# Altium PCB STEP_DRIVER_V3.0.PcbDoc (part 1 of 5)
Units mm, origin at the board's own origin, x right, y up, seen from the top; angles counter-clockwise.
Board outline 245.25 x 200.25 mm, 2 copper layers (Top Layer, Bottom Layer), stack 1.371 mm thick; 477 components, 170 nets, 1104 pads, 876 vias.
Unrouted connection lines stored in the file: 4.
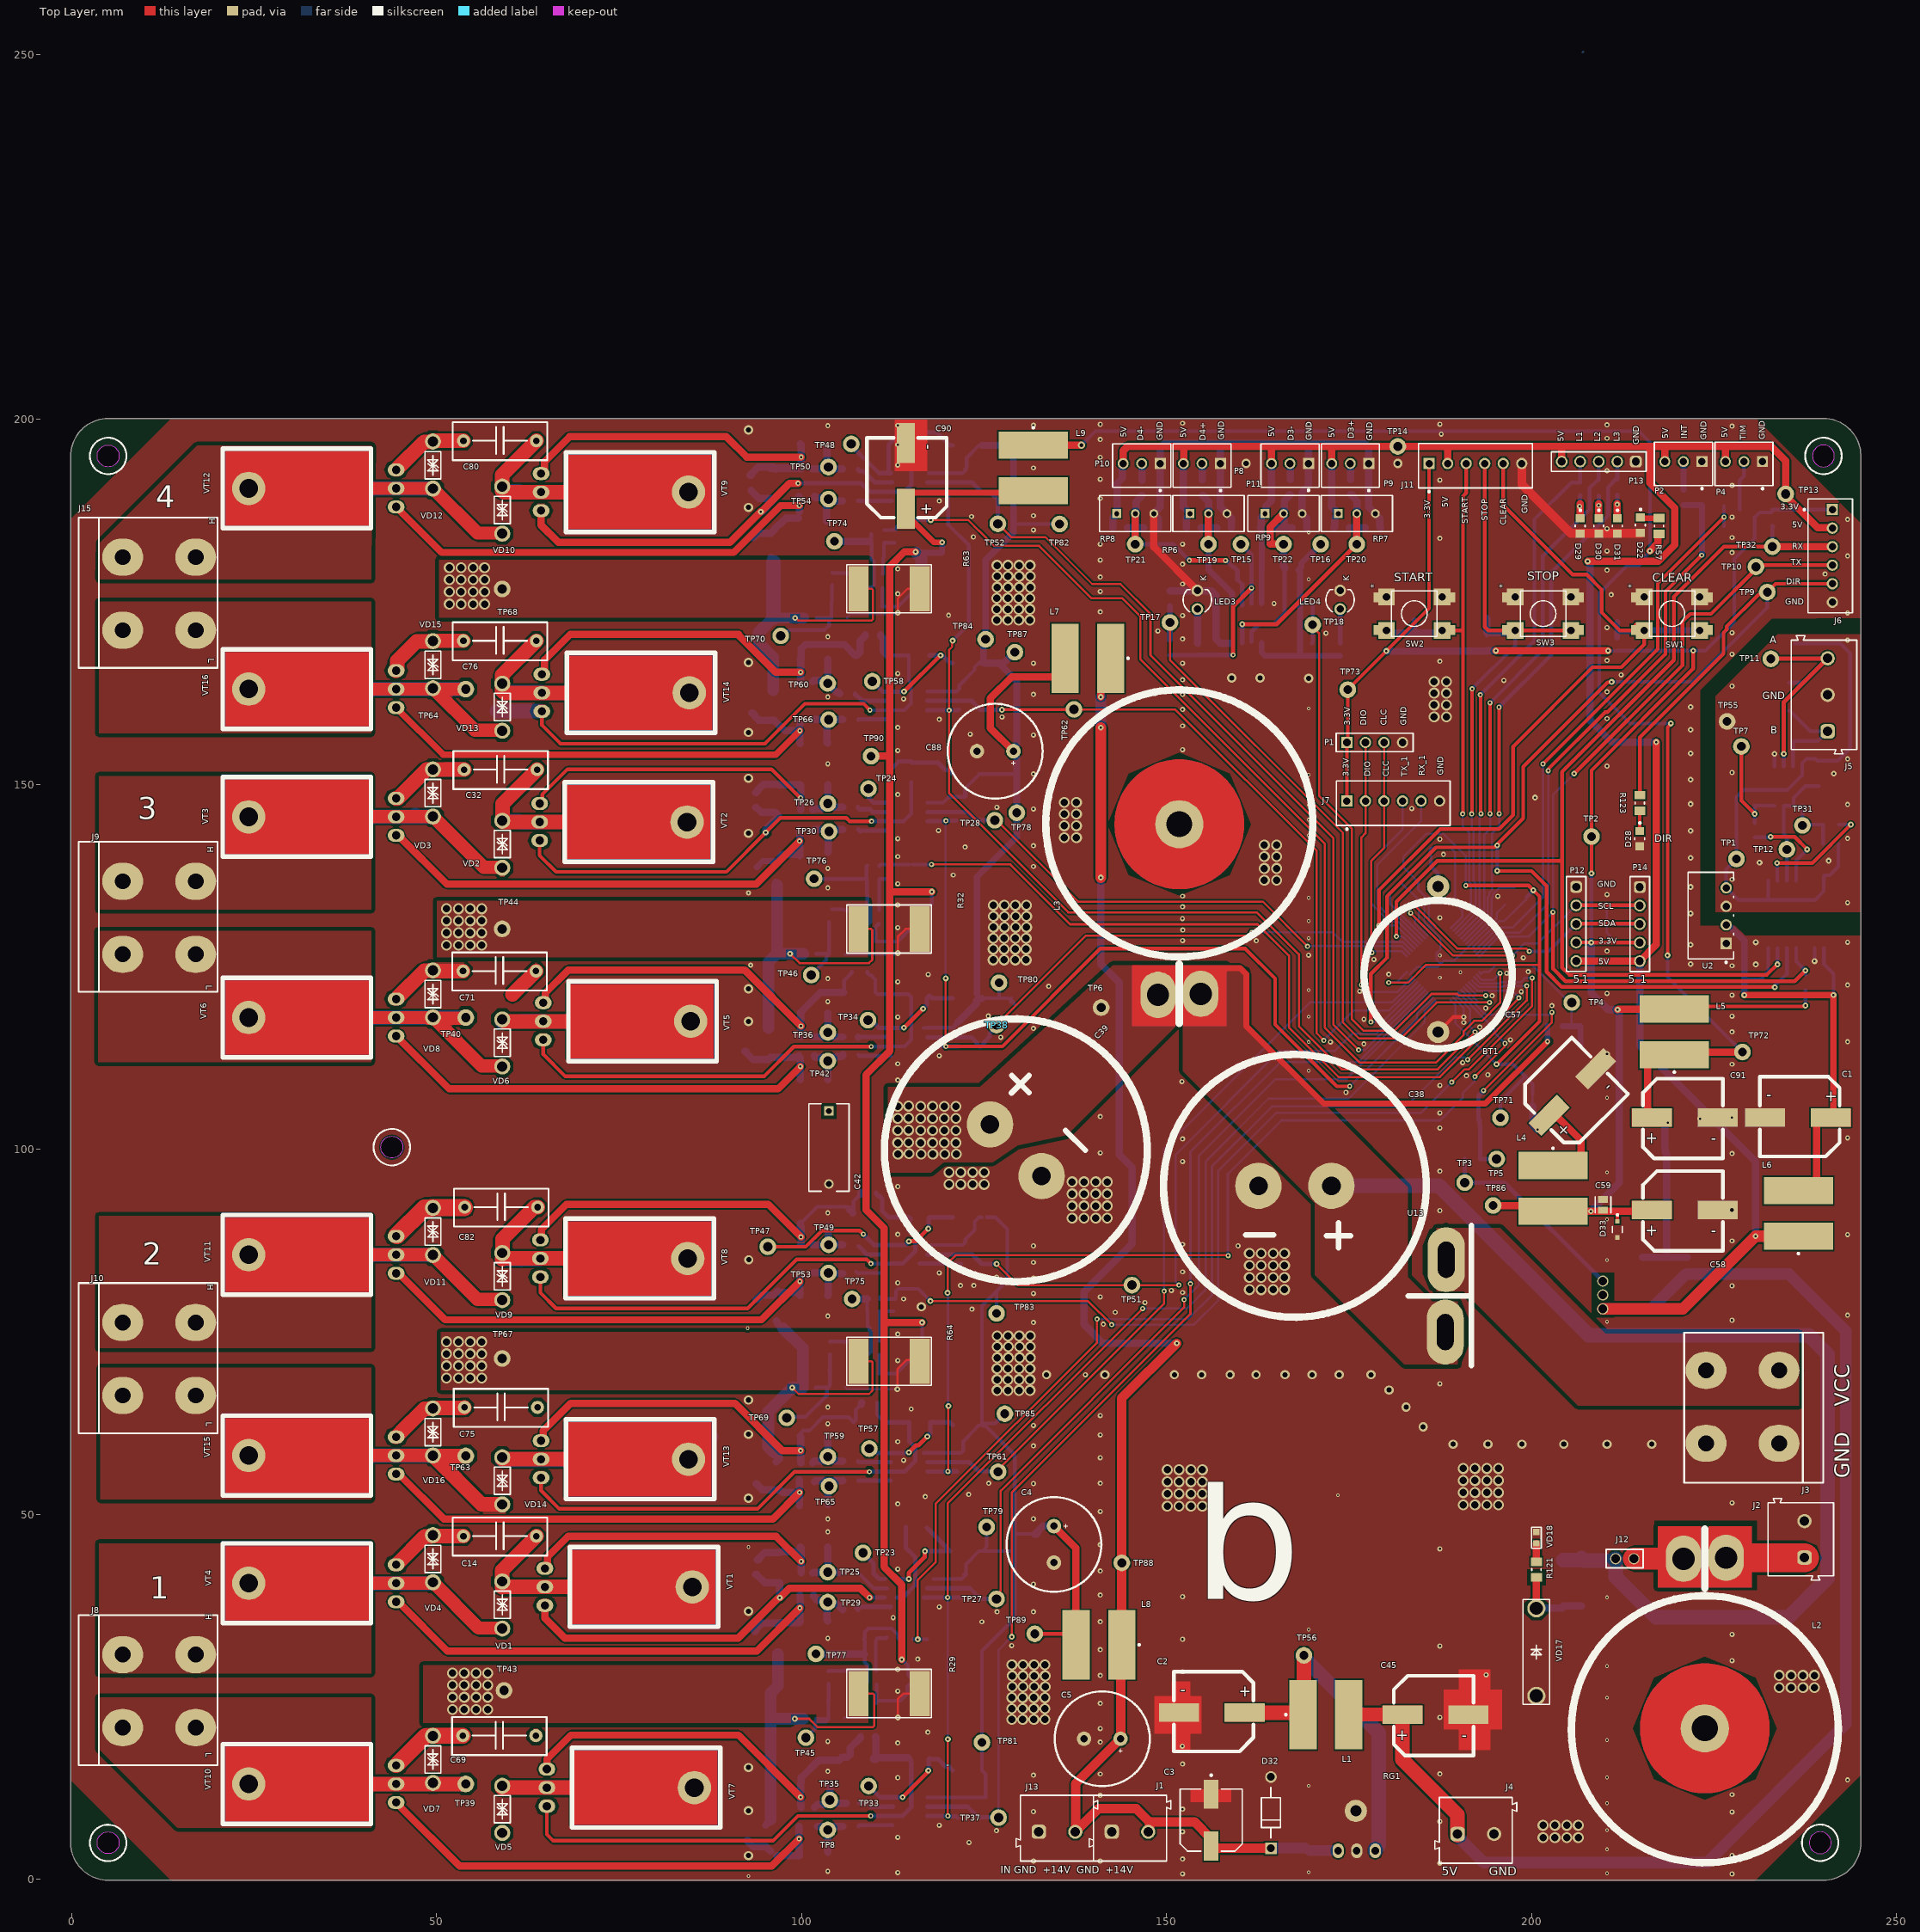
[diagram p0: Top Layer view]
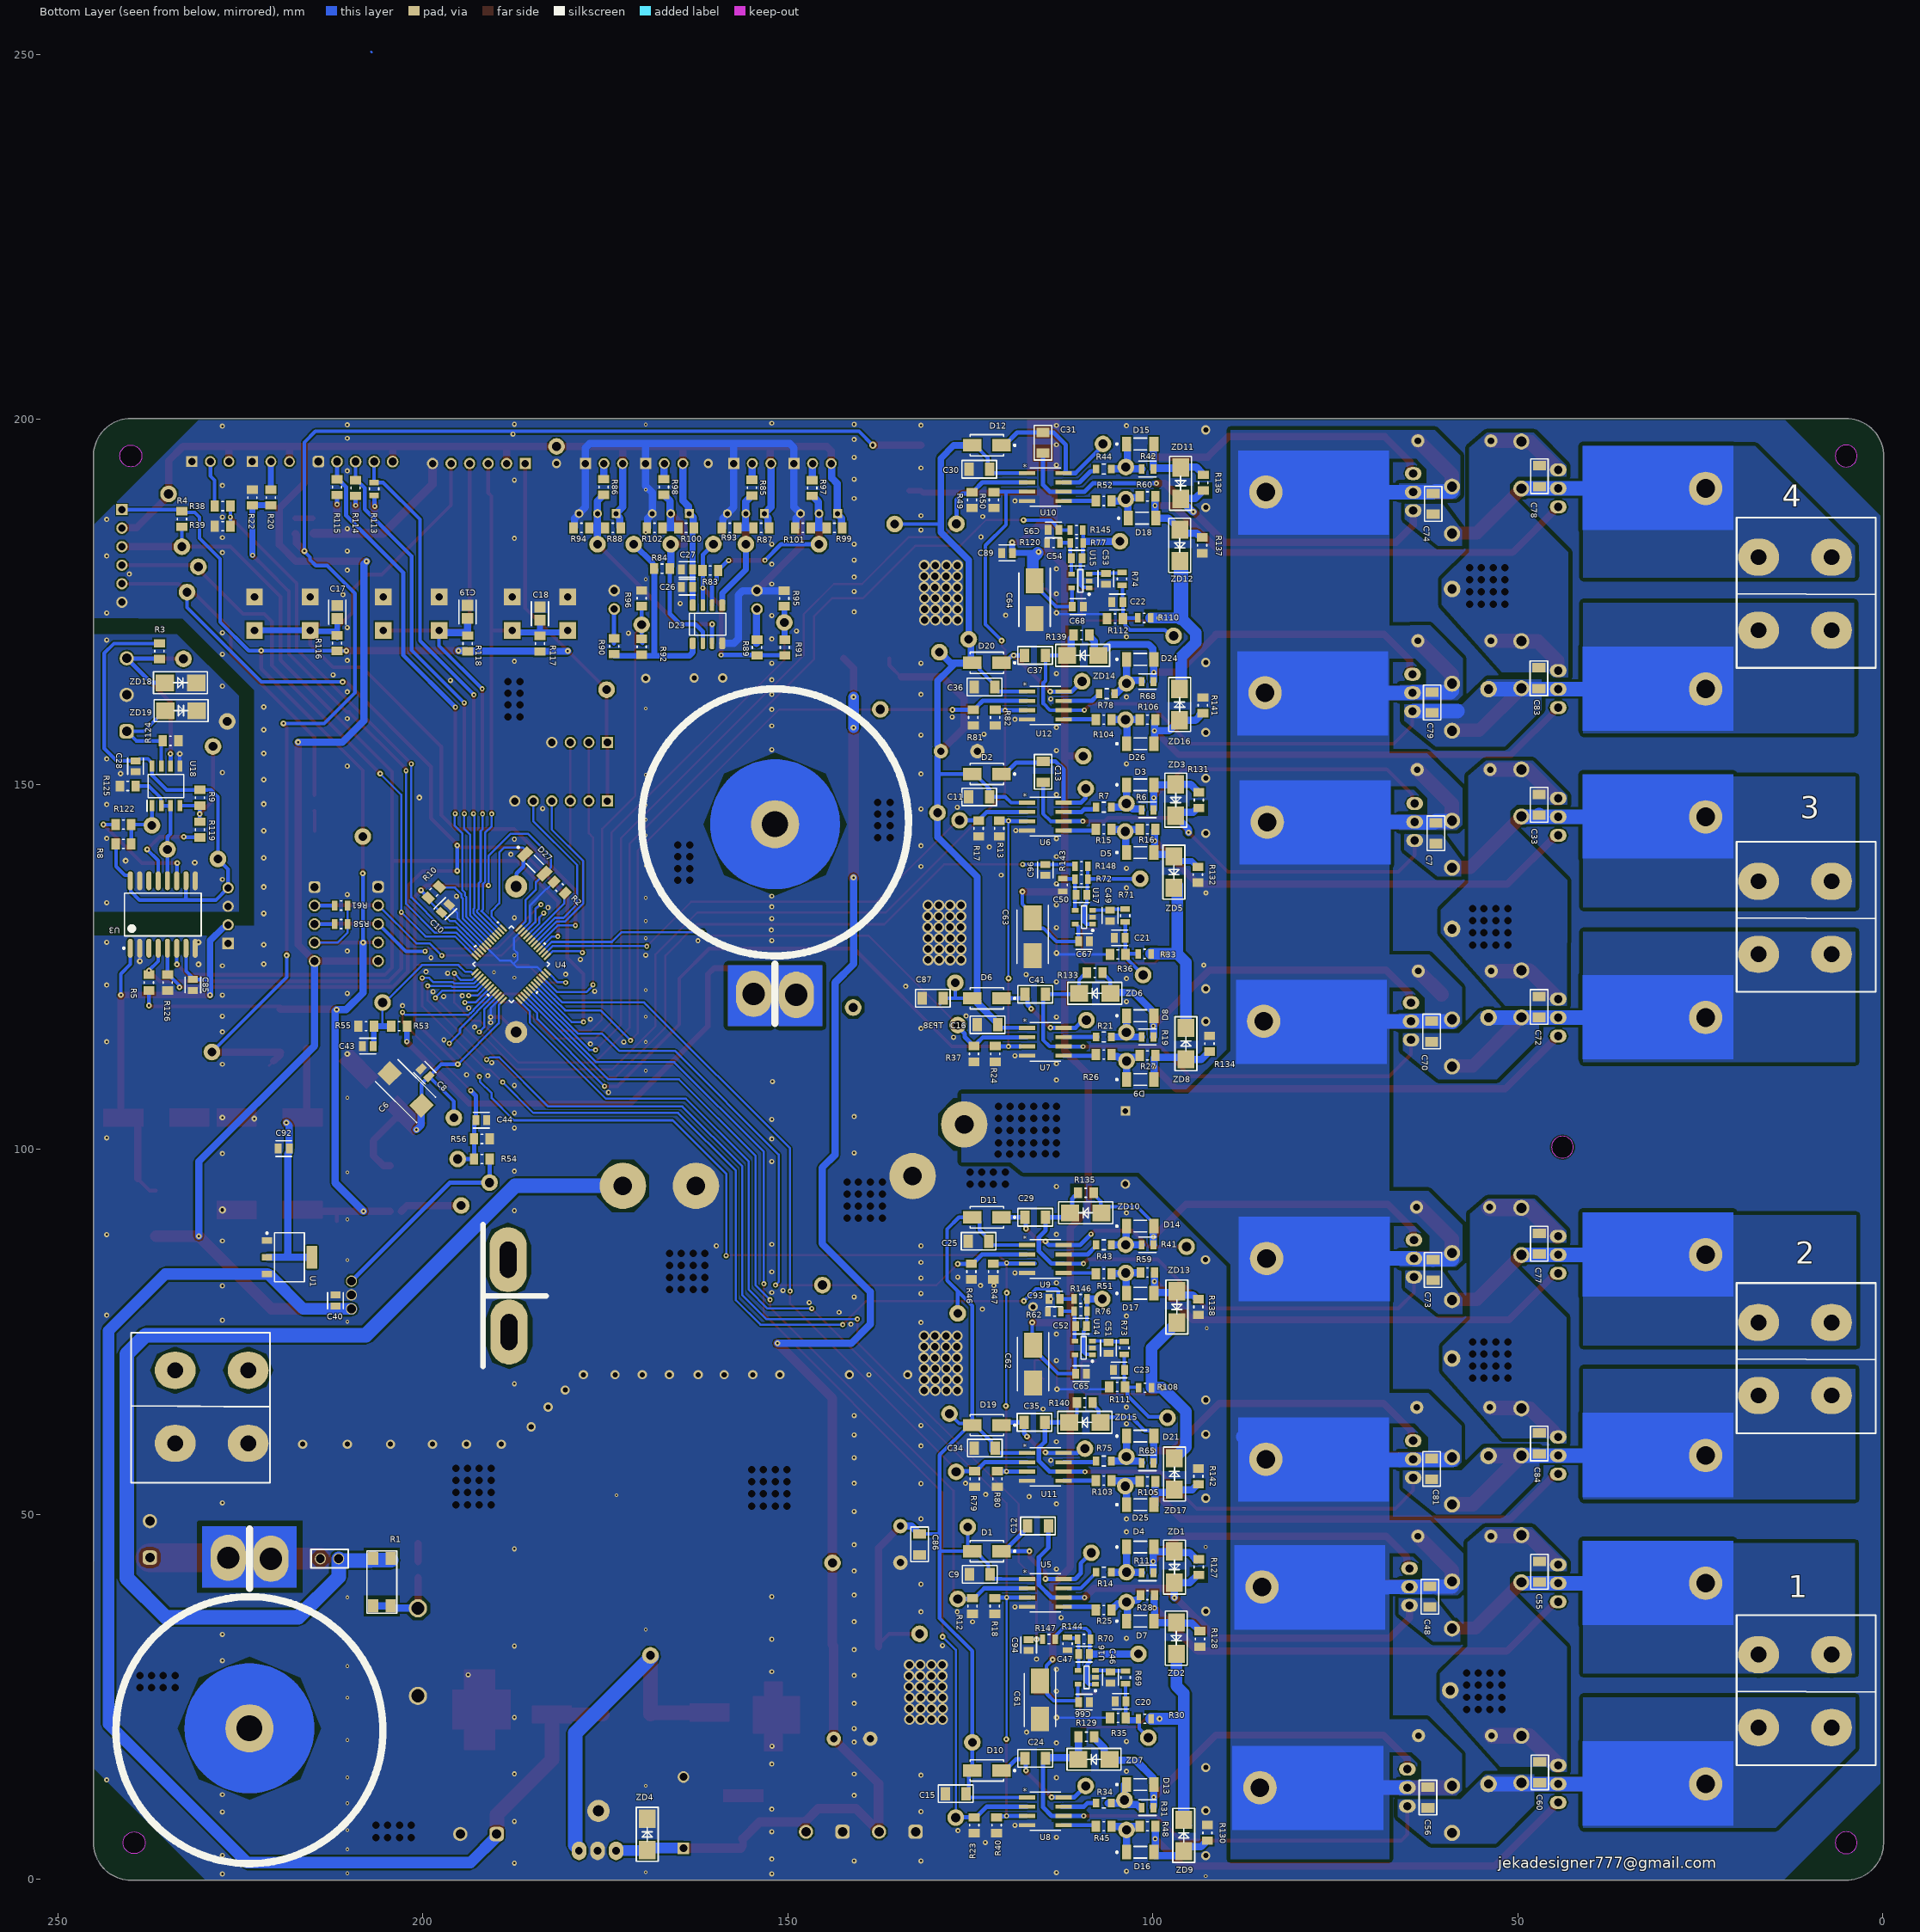
[diagram p1: Bottom Layer view, seen from below]
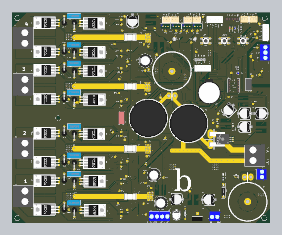
[diagram p5: 3D render of the assembled board from above, using the file's embedded part models]
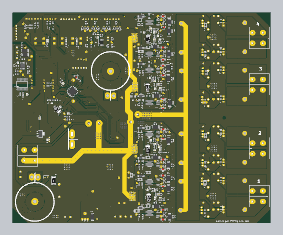
[diagram p6: 3D render of the assembled board from below, using the file's embedded part models]

## Layer stack, top to bottom
Top Solder: solder mask 0.0102, Solder Resist, Dk 3.5
Top Layer: signal copper 0.0356
Dielectric 1: dielectric 1.3, FR-4, Dk 4.8
Bottom Layer: signal copper 0.0356
Bottom Solder: solder mask 0.0102, Solder Resist, Dk 3.5

## Board outline
-0.127,4.914 -0.127,4.968 cw(c5.003,5) -0.127,5 cw(c0,5) -0.127,5.005 -0.127,194.914 cw(c0,194.914) -0.12,194.957 cw(c0,195) -0.127,195 cw(c5,195) 5,200.127 cw(c5,200) 5.003,200.127 240.026,200.127 cw(c240.027,200) 240.027,200.127 cw(c240,195) 245.126,195.136 cw(c245,195.115) 245.127,195.115 245.127,5.115 cw(c245,5.115) 245.114,5.057 cw(c245,5) 245.127,5 cw(c240,5) 240,-0.127 cw(c240,0) 239.998,-0.127 5,-0.127 cw(c5,5) -0.126,4.899 cw(c0,4.914)
cut-out: 238.5,195 ccw(c240,195) 240,193.5 ccw(c240,195) 241.5,195 ccw(c240,195) 240,196.5 ccw(c240,195)
cut-out: 43.868,98.8 cw(c43.868,100.3) 42.368,100.3 cw(c43.868,100.3) 43.868,101.8 cw(c43.868,100.3) 45.368,100.3 cw(c43.868,100.3)
cut-out: 5,193.5 cw(c5,195) 3.5,195 cw(c5,195) 5,196.5 cw(c5,195) 6.5,195 cw(c5,195)
cut-out: 5,3.5 cw(c5,5) 3.5,5 cw(c5,5) 5,6.5 cw(c5,5) 6.5,5 cw(c5,5)
cut-out: 238.05,5 ccw(c239.55,5) 239.55,3.5 ccw(c239.55,5) 241.05,5 ccw(c239.55,5) 239.55,6.5 ccw(c239.55,5)

## Design rules (kind name [scope] priority, off if disabled: settings)
Clearance HV [InNetClass('All Nets') vs InNetClass('HV')] p1: gap=0.2 ignorepadtopadclearanceinfootprint=TRUE except(0: Text-Text Text-Hole; 0.4: THPad-THPad THPad-Via THPad-Fill THPad-Poly THPad-Region THPad-Text THPad-Hole Via-Via Via-Fill Via-Poly Via-Region Via-Text Via-Hole; 0.5: SMDPad-SMDPad SMDPad-THPad SMDPad-Via SMDPad-Fill SMDPad-Poly SMDPad-Region SMDPad-Text SMDPad-Hole Fill-Fill Fill-Poly Fill-Region Fill-Text Fill-Hole Poly-Poly Poly-Region Poly-Text Poly-Hole Region-Region Region-Text Region-Hole)
Clearance Clearance_1 [All] p2: gap=0.18 ignorepadtopadclearanceinfootprint=TRUE
Clearance GND [InNet('GND')] p3: gap=0.4 ignorepadtopadclearanceinfootprint=TRUE except(0.3: Text-Text Text-Hole)
ComponentClearance [All] p1: gap=-2.254 collisioncheckmode=3 verticalgap=0.254 showdistances=FALSE
DiffPairsRouting [All] p1: maxlimit=0.254 minlimit=0.1 mostfreqgap=0.254 toplayer_minwidth=0.3 toplayer_maxwidth=2 toplayer_prefwidth=0.3 bottomlayer_minwidth=0.3 bottomlayer_maxwidth=2 bottomlayer_prefwidth=0.3 maxuncoupledlength=12.7
Height [All] p1: minheight=0 maxheight=55.4 prefheight=12.7
HoleSize [All] p1: absolutevalues=TRUE maxlimit=5 minlimit=0.025 maxpercent=80.000 minpercent=20.000
HoleToHoleClearance [All] p1: gap=0 allowstackedmicrovias=TRUE
LayerPairs [All] p1 off: enforce=TRUE
MinimumSolderMaskSliver [All] p1: minsoldermaskwidth=0.01
PlaneClearance [All] p1: clearance=0.4
PlaneConnect [All] p1: planeconnectstyle=Direct reliefexpansion=0.508 reliefentries=4 reliefconductorwidth=0.254 reliefairgap=0.254
PolygonConnect [All] p1: connectstyle=Direct reliefconductorwidth=0.254 reliefentries=4 polygonreliefangle="90 Angle" airgapwidth=0.254
RoutingCorners [All] p1: cornerstyle=45-Degree minsetback=0.2 maxsetback=0.2
RoutingVias [All] p1: holewidth=0.4 width=0.8 viastyle="Through Hole" minholewidth=0.254 minwidth=0.5 maxholewidth=0.75 maxwidth=1.5
ShortCircuit [All] p1: allowed=TRUE
SilkToSilkClearance [All] p1 off: silktosilkclearance=0.01
SilkToSolderMaskClearance [All] p1: minsilkscreentomaskgap=0 clearancetoexposedcopper=FALSE
SolderMaskExpansion [All] p1: expansion=0 istentingtop=FALSE
UnRoutedNet [All] p1: checkbadconnections=TRUE
Width [All] p1: maxlimit=10 minlimit=0.254 preferedwidth=2
16 further rules are at their usual default settings.

## Classes and differential pairs
net class HV: NetC7_1 NetC12_1 NetC14_2 NetC24_1 NetC29_1 NetC31_1 NetC32_2 NetC35_1 NetC37_1 NetC41_1 NetC75_2 NetC76_2 NetJ2_1 NetJ3_2 NetJ12_1 NetR1_1 V_BAT V_PS

## Components (designator, comment, footprint, x,y, rotation, side; value= is the part's Value field where it differs from the comment)
BT1 "CR2032_BAT" CR2032_BAT 187.218,123.95 r90 top locked
C1 "1000uF_10V" 1000uF_10V_Size_F 236.5,104.35 r0 top
C2 "1000uF_10V" 1000uF_10V_Size_F 156.2,22.85 r0 top
C3 "EEE-1HA101UP" FP-SF-MFG 156.125,8.1 r270 top value=100uF
C4 "25V 2200uF" CAPPOL-12x25 134.575,45.875 r270 top
C5 "25V 2200uF" CAPPOL-12x25 141.2,19.25 r180 top
C6 "293D106X9050E2TE3" CAPPM7343X430N#1 202.366,108.214 r45 bottom locked
C7 "1000pF" CAP-1206 61.213,143.3 r90 bottom
C8 "C0805C224K5RACTU" FP-C0805C-DN-MFG 199.699,110.5 r45 bottom locked value="0.22 μF"
C9 "CAP-NON-POLAR" CAP-1206 123.693,41.779 r180 bottom
C10 "C0805C224K5RACTU" FP-C0805C-DN-MFG 196.905,132.979 r135 bottom locked value="0.22 μF"
C11 "CAP-NON-POLAR" CAP-1206 123.784,148.285 r180 bottom
C12 "CAP-NON-POLAR" CAP-1206 115.725,48.4 r0 bottom
C13 "CAP-NON-POLAR" CAP-1206 115.023,151.714 r90 bottom
C14 "CAP-NON-POLAR" "MKP 100nF 275VAC" 58.675,47 r180 top locked
C15 "CAP-NON-POLAR" CAP-1206 126.993,11.723 r180 bottom
C16 "CAP-NON-POLAR" CAP-1206 122.636,117.065 r180 bottom
C17 "C0805C224K5RACTU" FP-C0805C-DN-IPC_A 211.712,173.6 r270 bottom value="0.22 μF"
C18 "C0805C224K5RACTU" FP-C0805C-DN-IPC_A 183.945,173.397 r270 bottom value="0.22 μF"
C19 "C0805C224K5RACTU" FP-C0805C-DN-IPC_A 193.873,173.631 r270 bottom value="0.22 μF"
C20 "C0805C224K5RACTU" FP-C0805C-DN-MFG 104.41,24.375 r0 bottom value="0.22 μF"
C21 "C0805C224K5RACTU" FP-C0805C-DN-MFG 104.521,128.979 r0 bottom value="0.22 μF"
C22 "C0805C224K5RACTU" FP-C0805C-DN-MFG 104.85,174.985 r0 bottom value="0.22 μF"
C23 "C0805C224K5RACTU" FP-C0805C-DN-MFG 104.618,69.775 r0 bottom value="0.22 μF"
C24 "CAP-NON-POLAR" CAP-1206 116.1,16.575 r0 bottom
C25 "CAP-NON-POLAR" CAP-1206 123.868,87.404 r180 bottom
C26 "C0805C224K5RACTU" FP-C0805C-DN-MFG 163.8,177.021 r0 bottom value="0.22 μF"
C27 "C0805C224K5RACTU" FP-C0805C-DN-MFG 163.8,179.434 r0 bottom value="0.22 μF"
C28 "C0805C224K5RACTU" FP-C0805C-DN-MFG 239.35,152.487 r270 bottom value="0.22 μF"
C29 "CAP-NON-POLAR" CAP-1206 116.097,90.691 r0 bottom
C30 "CAP-NON-POLAR" CAP-1206 123.768,193.175 r180 bottom
C31 "CAP-NON-POLAR" CAP-1206 115.043,196.811 r90 bottom
C32 "CAP-NON-POLAR" "MKP 100nF 275VAC" 58.775,152.025 r180 top locked
C33 "1000pF" CAP-1206 47.075,147.205 r270 bottom
C34 "CAP-NON-POLAR" CAP-1206 123.018,59.075 r180 bottom
C35 "CAP-NON-POLAR" CAP-1206 116.2,62.6 r0 bottom
C36 "CAP-NON-POLAR" CAP-1206 123.045,163.35 r180 bottom
C37 "CAP-NON-POLAR" CAP-1206 116.122,167.675 r0 bottom
C38 "CAP-POLAR" 4700uF_100V 167.593,95 r180 top locked
C39 "CAP-POLAR" 4700uF_100V 129.357,99.875 r315 top locked
C40 "C0805C224K5RACTU" FP-C0805C-DN-MFG 211.975,79.286 r90 bottom value="0.22 μF"
C41 "CAP-NON-POLAR" CAP-1206 116.097,121.248 r0 bottom
C42 "ECQ-E2224JFW" FP-ECQ-E2224JFW-MFG 103.751,100.25 r270 top
C43 "2.2uF" FP-C0805C-DN-MFG 207.543,114.151 r180 bottom value="0.22 μF"
C44 "2.2uF" FP-C0805C-DN-MFG 191.991,104 r0 bottom value="0.22 μF"
C45 "1000uF_10V" 1000uF_10V_Size_F 186.85,22.55 r180 top
C46 "C0805C224K5RACTU" FP-C0805C-DN-MFG 105.792,27.65 r270 bottom value="0.22 μF"
C47 "0.22uF" FP-C0805C-DN-MFG 109.405,30.831 r180 bottom value="0.22 μF"
C48 "1000pF" CAP-1206 62.025,38.7 r90 bottom
C49 "C0805C224K5RACTU" FP-C0805C-DN-MFG 105.852,132.025 r270 bottom value="0.22 μF"
C50 "0.22uF" FP-C0805C-DN-MFG 109.778,134.869 r180 bottom value="0.22 μF"
C51 "C0805C224K5RACTU" FP-C0805C-DN-MFG 106.072,72.8 r270 bottom value="0.22 μF"
C52 "0.22uF" FP-C0805C-DN-MFG 109.822,75.772 r180 bottom value="0.22 μF"
C53 "C0805C224K5RACTU" FP-C0805C-DN-MFG 106.418,178.148 r270 bottom value="0.22 μF"
C54 "0.22uF" FP-C0805C-DN-MFG 110.418,180.993 r180 bottom value="0.22 μF"
C55 "1000pF" CAP-1206 47.025,42.125 r270 bottom
C56 "1000pF" CAP-1206 62.3,11.189 r90 bottom
C57 "1000uF_10V" 1000uF_10V_Size_F 205.607,107.849 r225 top
C58 "1000uF_10V" 1000uF_10V_Size_F 221,91.7 r180 top locked
C59 "C0805C224K5RACTU" FP-C0805C-DN-MFG 209.8,92.4 r90 top value="0.22 μF"
C60 "1000pF" CAP-1206 46.975,14.65 r270 bottom
C61 "293D106X9050E2TE3" CAPPM7343X430N#2 115.45,24.55 r270 bottom
C62 "293D106X9050E2TE3" CAPPM7343X430N#2 116.4,70.575 r270 bottom
C63 "293D106X9050E2TE3" CAPPM7343X430N#2 116.45,129.134 r270 bottom
C64 "293D106X9050E2TE3" CAPPM7343X430N#2 116.2,175.31 r270 bottom
C65 "C0805C224K5RACTU" FP-C0805C-DN-MFG 109.822,69.275 r180 bottom value="0.22 μF"
C66 "C0805C224K5RACTU" FP-C0805C-DN-MFG 109.405,24.275 r180 bottom value="0.22 μF"
C67 "C0805C224K5RACTU" FP-C0805C-DN-MFG 109.427,128.479 r180 bottom value="0.22 μF"
C68 "C0805C224K5RACTU" FP-C0805C-DN-MFG 110.268,174.36 r180 bottom value="0.22 μF"
C69 "CAP-NON-POLAR" "MKP 100nF 275VAC" 58.6,19.675 r180 top locked
C70 "1000pF" CAP-1206 61.8,116.15 r90 bottom
C71 "CAP-NON-POLAR" "MKP 100nF 275VAC" 58.625,124.425 r180 top locked
C72 "1000pF" CAP-1206 47.073,119.505 r270 bottom
C73 "1000pF" CAP-1206 61.6,83.475 r90 bottom
C74 "1000pF" CAP-1206 61.575,188.44 r90 bottom
C75 "CAP-NON-POLAR" "MKP 100nF 275VAC" 58.825,64.65 r180 top locked
C76 "CAP-NON-POLAR" "MKP 100nF 275VAC" 58.675,169.675 r180 top locked
C77 "1000pF" CAP-1206 47.05,87.075 r270 bottom
C78 "1000pF" CAP-1206 47.025,192.225 r270 bottom
C79 "1000pF" CAP-1206 61.725,161.225 r90 bottom
C80 "CAP-NON-POLAR" "MKP 100nF 275VAC" 58.675,197.075 r180 top locked
C81 "1000pF" CAP-1206 61.8,56.225 r90 bottom
C82 "CAP-NON-POLAR" "MKP 100nF 275VAC" 58.85,92.075 r180 top locked
C83 "1000pF" CAP-1206 47.1,164.55 r270 bottom
C84 "1000pF" CAP-1206 47.057,59.705 r270 bottom
C85 "C0805C224K5RACTU" FP-C0805C-DN-MFG 231.505,122.525 r270 bottom value="0.22 μF"
C86 "1000pF" CAP-1206 131.95,45.875 r90 bottom
C87 "1000pF" CAP-1206 130.143,120.698 r180 bottom
C88 "25V 2200uF" CAPPOL-12x25 126.525,154.55 r180 top
C89 "C0805C224K5RACTU" FP-C0805C-DN-MFG 119.965,181.718 r0 bottom value="0.22 μF"
C90 "1000uF_10V" 1000uF_10V_Size_F 114.299,192.262 r270 top
C91 "1000uF_10V" 1000uF_10V_Size_F 221,104.35 r180 top locked
C92 "C0805C224K5RACTU" FP-C0805C-DN-MFG 219.05,100.1 r0 bottom value="0.22 μF"
C93 "C0805C224K5RACTU" FP-C0805C-DN-MFG 113.466,79.5 r0 bottom value="0.22 μF"
C94 "C0805C224K5RACTU" FP-C0805C-DN-MFG 117,32.1 r270 bottom value="0.22 μF"
C95 "C0805C224K5RACTU" FP-C0805C-DN-MFG 113.593,184.85 r0 bottom value="0.22 μF"
C96 "C0805C224K5RACTU" FP-C0805C-DN-MFG 114.718,138.275 r270 bottom value="0.22 μF"
D1 "US1G-13-F" FP-SMA-MFG 122.718,44.946 r0 bottom locked value=20pF
D2 "US1G-13-F" FP-SMA-MFG 122.718,151.427 r0 bottom locked value=20pF
D3 "LL4448-GS08" FP-6_560-5005_01-4-MFG 101.718,149.939 r180 bottom locked value=4pF
D4 "LL4448-GS08" FP-6_560-5005_01-4-MFG 101.718,45.524 r180 bottom locked value=4pF
D5 "LL4448-GS08" FP-6_560-5005_01-4-MFG 101.718,140.668 r180 bottom locked value=4pF
D6 "US1G-13-F" FP-SMA-MFG 122.718,120.698 r0 bottom locked value=20pF
D7 "LL4448-GS08" FP-6_560-5005_01-4-MFG 101.718,35.364 r180 bottom locked value=4pF
D8 "LL4448-GS08" FP-6_560-5005_01-4-MFG 101.716,118.302 r180 bottom locked value=4pF
D9 "LL4448-GS08" FP-6_560-5005_01-4-MFG 101.718,109.558 r180 bottom locked value=4pF
D10 "US1G-13-F" FP-SMA-MFG 122.718,14.897 r0 bottom locked value=20pF
D11 "US1G-13-F" FP-SMA-MFG 122.718,90.691 r0 bottom locked value=20pF
D12 "US1G-13-F" FP-SMA-MFG 122.718,196.451 r0 bottom locked value=20pF
D13 "LL4448-GS08" FP-6_560-5005_01-4-MFG 101.718,12.975 r180 bottom locked value=4pF
D14 "LL4448-GS08" FP-6_560-5005_01-4-MFG 101.718,89.477 r180 bottom locked value=4pF
D15 "LL4448-GS08" FP-6_560-5005_01-4-MFG 101.718,196.635 r180 bottom locked value=4pF
D16 "LL4448-GS08" FP-6_560-5005_01-4-MFG 101.718,3.704 r180 bottom locked value=4pF
D17 "LL4448-GS08" FP-6_560-5005_01-4-MFG 101.718,80.275 r180 bottom locked value=4pF
D18 "LL4448-GS08" FP-6_560-5005_01-4-MFG 101.468,186.475 r180 bottom locked value=4pF
D19 "US1G-13-F" FP-SMA-MFG 122.718,62.215 r0 bottom locked value=20pF
D20 "US1G-13-F" FP-SMA-MFG 122.718,166.652 r0 bottom locked value=20pF
D21 "LL4448-GS08" FP-6_560-5005_01-4-MFG 101.718,60.719 r180 bottom locked value=4pF
D22 "151031YS06000" LED_Yellow 214.92,185.525 r270 top
D23 "LMV358AIDR" 8-SOIC 161.006,171.941 r90 bottom
D24 "LL4448-GS08" FP-6_560-5005_01-4-MFG 101.718,167.13 r180 bottom locked value=4pF
D25 "LL4448-GS08" FP-6_560-5005_01-4-MFG 101.718,51.321 r180 bottom locked value=4pF
D26 "LL4448-GS08" FP-6_560-5005_01-4-MFG 101.718,155.569 r180 bottom locked value=4pF
D27 "LL4448-GS08" FP-6_560-5005_01-4-MFG 184.668,139.1 r225 bottom value=4pF
D28 "151031YS06000" LED_BLUE 214.825,142.559 r270 top
D29 "151031YS06000" Wurth_Electronics_0_MFG 206.675,185.4 r270 top
D30 "151031YS06000" LED_GREEN 209.215,185.4 r270 top
D31 "151031YS06000" LED_BLUE 211.755,185.4 r270 top
D32 "BZX85C15-TAP" FP-6_561-5001_02-4-MFG 164.3,9.125 r90 top
D33 "BZX384-C5V1,115" FP-SOD323-MFG 211.775,89.025 r270 top
J1 "691101710002" 691101710002 145,7 r0 top
J2 "691101710002" 691101710002 236.9,46.575 r90 top
J3 "TL-800" Conn_Tianli_T-800 228.925,64.725 r90 top
J4 "691101710002" 691101710002 192.375,6.7 r0 top
J5 "691101710003" 691101710003 240.075,162.275 r90 top locked
J6 "SWR25X-NRTC-S06-ST-BA" Sullins_SWR25X-NRTC-S06-ST-BA_MFG 240.925,181.3 r270 top locked
J7 "SWR25X-NRTC-S06-ST-BA" Sullins_SWR25X-NRTC-S06-ST-BA_MFG 181.063,147.425 r0 top
J8 "TL-800" Conn_Tianli_T-800 12,25.775 r270 top locked
J9 "TL-800" Conn_Tianli_T-800 12,131.725 r270 top locked
J10 "TL-800" Conn_Tianli_T-800 12,71.275 r270 top locked
J11 "SWR25X-NRTC-S06-ST-BA" Sullins_SWR25X-NRTC-S06-ST-BA_MFG 192.324,193.663 r0 top
J12 "Jumper 1x2.54" Jumper_2.54 214.037,43.916 r180 top
J13 "691101710002" 691101710002 135,7 r0 top locked
J15 "TL-800" Conn_Tianli_T-800 12,176.125 r270 top locked
L1 "744776227" WE-PD2_1054 1441.839,1292.55 r0 top
L2 "Coil" Coil_drosel 233.91,15.214 r0 top locked
L3 "Coil" Coil_drosel 141.593,150 r180 top locked
L4 "744776227" WE-PD2_1054 1472.943,-1175.35 r270 top
L5 "744776227" WE-PD2_1054 -1050.436,1386.086 r90 top
L6 "744776227" WE-PD2_1054 -1033.425,1361.225 r90 top locked
L7 "744776227" WE-PD2_1054 -1130.775,-1102.725 r180 top
L8 "744776227" WE-PD2_1054 -1129.25,-1237.875 r180 top
L9 "744776227" WE-PD2_1054 1401.754,-1076.647 r270 top
LED3 "151033BS03000" "Type 3mm" 154.224,175.294 r90 top
LED4 "151033BS03000" "Type 3mm" 173.782,175.294 r90 top
P1 "TSW-104-08-G-S" SMTC-TSW-104-08-X-S 174.713,155.748 r0 top
P2 "61900311121" 61900311121 220.82,193.925 r0 top
P4 "61900311121" 61900311121 229.11,193.925 r0 top
P8 "61900311121" 61900311121 154.859,193.663 r0 top
P9 "61900311121" 61900311121 175.179,193.663 r0 top
P10 "61900311121" 61900311121 146.604,193.663 r0 top
P11 "61900311121" 61900311121 166.924,193.663 r0 top
P12 "61300511121" 61300511121 206.12,130.88 r270 top
P13 "61300511121" 61300511121 209.215,194.217 r180 top
P14 "61300511121" 61300511121 214.834,130.859 r270 top
R1 "4.7K" RES-2512 205.625,40.725 r90 bottom
R2 "RC0805FR-07100KL" Yageo_RC0805_IPC_A 181.268,135.874 r45 bottom
R3 "RC0805FR-07100KL" Yageo_RC0805_IPC_A 236.092,168.25 r90 bottom
R4 "RC0805FR-07100KL" Yageo_RC0805_IPC_A 233,186.35 r90 bottom
R5 "RC0805FR-07100KL" Yageo_RC0805_IPC_A 237.53,122.85 r270 bottom
R6 "RT0805FRE0710RL" FP-RT0805-IPC_C 100.718,146.51 r180 bottom locked value=10Ω
R7 "RT0805FRE0710RL" FP-RT0805-MFG 106.718,146.891 r180 bottom locked value=10Ω
R8 "10K" Yageo_RC0805_IPC_A 241.023,141.851 r0 bottom
R9 "10K" Yageo_RC0805_IPC_A 230.55,148.175 r90 bottom
R10 "RC0805FR-07100KL" Yageo_RC0805_IPC_A 198.496,135.225 r315 bottom
R11 "RT0805FRE0710RL" FP-RT0805-IPC_C 100.718,41.968 r180 bottom locked value=10Ω
R12 "RC0805FR-07100KL" Yageo_RC0805_IPC_A 124.693,37.423 r90 bottom locked
R13 "RC0805FR-07100KL" Yageo_RC0805_IPC_A 121.024,143.959 r90 bottom
R14 "RT0805FRE0710RL" FP-RT0805-MFG 106.718,42.082 r180 bottom locked value=10Ω
R15 "RC0805FR-07100KL" Yageo_RC0805_IPC_A 106.718,143.843 r0 bottom locked
R16 "RC0805FR-07100KL" Yageo_RC0805_IPC_A 100.718,143.843 r0 bottom locked
R17 "RC0805FR-07100KL" Yageo_RC0805_IPC_A 123.857,143.959 r90 bottom locked
R18 "RC0805FR-07100KL" Yageo_RC0805_IPC_A 121.649,37.423 r90 bottom locked
R19 "RT0805FRE0710RL" FP-RT0805-IPC_C 100.718,115.4 r180 bottom locked value=10Ω
R20 "RC0805FR-07100KL" Yageo_RC0805_IPC_A 220.82,189.3 r90 bottom
R21 "RT0805FRE0710RL" FP-RT0805-MFG 106.718,115.4 r180 bottom locked value=10Ω
R22 "RC0805FR-07100KL" Yageo_RC0805_IPC_A 223.36,189.3 r90 bottom
R23 "RC0805FR-07100KL" Yageo_RC0805_IPC_A 124.448,7.404 r90 bottom locked
R24 "RC0805FR-07100KL" Yageo_RC0805_IPC_A 121.568,113.078 r90 bottom locked
R25 "RC0805FR-07100KL" Yageo_RC0805_IPC_A 106.718,36.897 r0 bottom locked
R26 "RC0805FR-07100KL" Yageo_RC0805_IPC_A 106.718,112.987 r0 bottom locked
R27 "RC0805FR-07100KL" Yageo_RC0805_IPC_A 100.718,112.86 r0 bottom locked
R28 "10" FP-CRCW0805-e3-IPC_B 100.718,38.92 r0 bottom locked
R29 "RES-CONST" RES-3921 112,25.45 r180 top locked
R30 "10K" Yageo_RC0805_IPC_C 101.093,21.986 r180 bottom
R31 "RT0805FRE0710RL" FP-RT0805-IPC_C 100.718,9.8 r180 bottom locked value=10Ω
R32 "RES-CONST" RES-3921 112,130.19 r180 top locked
R33 "10K" Yageo_RC0805_IPC_C 101.116,126.79 r180 bottom
R34 "RT0805FRE0710RL" FP-RT0805-MFG 106.718,10.435 r180 bottom locked value=10Ω
R35 "1K" Yageo_RC0805_IPC_A 104.768,22.1 r180 bottom
R36 "1K" Yageo_RC0805_IPC_A 104.791,126.71 r180 bottom
R37 "RC0805FR-07100KL" Yageo_RC0805_IPC_A 124.493,113.078 r90 bottom locked
R38 "RC0805FR-07100KL" Yageo_RC0805_IPC_A 227.425,188.125 r0 bottom
R39 "RC0805FR-07100KL" Yageo_RC0805_IPC_A 227.425,185.375 r0 bottom
R40 "RC0805FR-07100KL" Yageo_RC0805_IPC_A 121.386,7.404 r90 bottom locked
R41 "RT0805FRE0710RL" FP-RT0805-IPC_C 100.718,86.922 r180 bottom locked value=10Ω
R42 "RT0805FRE0710RL" FP-RT0805-IPC_C 100.718,193.206 r180 bottom value=10Ω
R43 "RT0805FRE0710RL" FP-RT0805-MFG 106.718,86.922 r180 bottom locked value=10Ω
R44 "RT0805FRE0710RL" FP-RT0805-MFG 106.718,193.206 r180 bottom locked value=10Ω
R45 "RC0805FR-07100KL" Yageo_RC0805_IPC_A 106.718,7.26 r0 bottom locked
R46 "RC0805FR-07100KL" Yageo_RC0805_IPC_A 124.85,83.25 r90 bottom locked
R47 "RC0805FR-07100KL" Yageo_RC0805_IPC_A 121.85,83.25 r90 bottom locked
R48 "RC0805FR-07100KL" Yageo_RC0805_IPC_A 100.718,7.26 r0 bottom locked
R49 "RC0805FR-07100KL" Yageo_RC0805_IPC_A 124.768,188.95 r90 bottom locked
R50 "RC0805FR-07100KL" Yageo_RC0805_IPC_A 121.768,188.95 r90 bottom locked
R51 "RC0805FR-07100KL" Yageo_RC0805_IPC_A 106.718,82.965 r0 bottom locked
R52 "RC0805FR-07100KL" Yageo_RC0805_IPC_A 106.718,188.831 r0 bottom locked
R53 "RC0805FR-07100KL" Yageo_RC0805_IPC_A 203.243,116.875 r180 bottom
R54 "RC0805FR-07100KL" Yageo_RC0805_IPC_A 191.913,98.675 r180 bottom
R55 "RC0805FR-07100KL" Yageo_RC0805_IPC_A 207.768,116.875 r180 bottom
R56 "RC0805FR-07100KL" Yageo_RC0805_IPC_A 191.918,101.425 r0 bottom
R57 "220" Yageo_RC0805_IPC_A 217.483,185.4 r270 top
R58 "10K" Yageo_RC0805_IPC_C 211.2,130.859 r0 bottom
R59 "10" FP-CRCW0805-e3-IPC_B 100.718,83.119 r0 bottom locked
R60 "RC0805FR-07100KL" Yageo_RC0805_IPC_A 100.716,189.456 r0 bottom
R61 "10K" Yageo_RC0805_IPC_C 211.2,133.399 r0 bottom
R62 "10K" Yageo_RC0805_IPC_C 113.465,77.784 r0 bottom
R63 "RES-CONST" RES-3921 112,176.812 r180 top
R64 "RES-CONST" RES-3921 112,70.975 r180 top locked
R65 "RT0805FRE0710RL" FP-RT0805-IPC_C 100.718,57.036 r180 bottom locked value=10Ω
R68 "RT0805FRE0710RL" FP-RT0805-IPC_C 100.718,164.082 r180 bottom locked value=10Ω
R69 "10K" Yageo_RC0805_IPC_C 103.718,27.65 r270 bottom
R70 "10K" Yageo_RC0805_IPC_C 109.405,32.9 r0 bottom
R71 "10K" Yageo_RC0805_IPC_C 103.771,132.025 r270 bottom
R72 "10K" Yageo_RC0805_IPC_C 109.778,137.02 r0 bottom
R73 "10K" Yageo_RC0805_IPC_C 103.897,72.8 r270 bottom
R74 "1K" Yageo_RC0805_IPC_C 104.218,178.148 r270 bottom
R75 "RT0805FRE0710RL" FP-RT0805-MFG 106.718,57.29 r180 bottom locked value=10Ω
R76 "10K" Yageo_RC0805_IPC_C 109.872,77.822 r0 bottom
R77 "100K" Yageo_RC0805_IPC_C 110.418,183.093 r0 bottom
R78 "RT0805FRE0710RL" FP-RT0805-MFG 106.293,162.436 r180 bottom value=10Ω
R79 "RC0805FR-07100KL" Yageo_RC0805_IPC_A 124.393,54.849 r90 bottom
R80 "RC0805FR-07100KL" Yageo_RC0805_IPC_A 121.293,54.849 r90 bottom locked
R81 "RC0805FR-07100KL" Yageo_RC0805_IPC_A 124.596,159.159 r90 bottom locked
R82 "RC0805FR-07100KL" Yageo_RC0805_IPC_A 121.596,159.159 r90 bottom locked
R83 "RC0805FR-07100KL" Yageo_RC0805_IPC_A 160.625,179.307 r0 bottom
R84 "RC0805FR-07100KL" Yageo_RC0805_IPC_A 167.229,179.561 r0 bottom
R85 "RC0805FR-07100KL" Yageo_RC0805_IPC_A 154.91,190.645 r270 bottom
R86 "RC0805FR-07100KL" Yageo_RC0805_IPC_A 175.23,190.737 r270 bottom
R87 "RC0805FR-07100KL" Yageo_RC0805_IPC_A 153.64,185.149 r180 bottom
R88 "RC0805FR-07100KL" Yageo_RC0805_IPC_A 173.96,185.149 r180 bottom
R89 "RC0805FR-07100KL" Yageo_RC0805_IPC_A 154.224,168.748 r270 bottom
R90 "RC0805FR-07100KL" Yageo_RC0805_IPC_A 173.782,168.923 r270 bottom
R91 "RC0805FR-07100KL" Yageo_RC0805_IPC_A 150.414,168.748 r270 bottom
R92 "RC0805FR-07100KL" Yageo_RC0805_IPC_A 170.023,168.85 r270 bottom
R93 "RC0805FR-07100KL" Yageo_RC0805_IPC_A 157.958,185.149 r180 bottom
R94 "RC0805FR-07100KL" Yageo_RC0805_IPC_A 178.278,185.149 r180 bottom
R95 "RC0805FR-07100KL" Yageo_RC0805_IPC_A 150.482,175.48 r270 bottom
R96 "RC0805FR-07100KL" Yageo_RC0805_IPC_A 170.023,175.497 r270 bottom
R97 "RC0805FR-07100KL" Yageo_RC0805_IPC_A 146.655,190.61 r270 bottom
R98 "RC0805FR-07100KL" Yageo_RC0805_IPC_A 166.975,190.737 r270 bottom
R99 "RC0805FR-07100KL" Yageo_RC0805_IPC_A 143.607,185.149 r180 bottom
R100 "RC0805FR-07100KL" Yageo_RC0805_IPC_A 163.927,185.149 r180 bottom
R101 "RC0805FR-07100KL" Yageo_RC0805_IPC_A 147.925,185.149 r0 bottom
R102 "RC0805FR-07100KL" Yageo_RC0805_IPC_A 168.245,185.149 r0 bottom
R103 "RC0805FR-07100KL" Yageo_RC0805_IPC_A 106.718,54.623 r0 bottom locked
R104 "RC0805FR-07100KL" Yageo_RC0805_IPC_A 106.718,158.871 r0 bottom locked
R105 "RC0805FR-07100KL" Yageo_RC0805_IPC_A 100.718,54.496 r0 bottom locked
R106 "RC0805FR-07100KL" Yageo_RC0805_IPC_A 100.718,158.871 r0 bottom locked
R108 "10K" Yageo_RC0805_IPC_C 101.043,67.35 r180 bottom
R110 "10K" Yageo_RC0805_IPC_C 101.168,172.804 r180 bottom
R111 "1K" Yageo_RC0805_IPC_A 104.876,67.45 r180 bottom
R112 "1K" Yageo_RC0805_IPC_A 105.17,172.725 r180 bottom
R113 "220" Yageo_RC0805_IPC_C 206.675,190.48 r90 bottom
R114 "220" Yageo_RC0805_IPC_A 209.215,190.603 r90 bottom
R115 "220" Yageo_RC0805_IPC_A 211.755,190.725 r90 bottom
R116 "RC0805FR-07100KL" Yageo_RC0805_IPC_A 211.741,169.35 r270 bottom
R117 "RC0805FR-07100KL" Yageo_RC0805_IPC_A 183.945,169.284 r270 bottom
R118 "RC0805FR-07100KL" Yageo_RC0805_IPC_A 193.864,169.3 r270 bottom
R119 "100" Yageo_RC0805_IPC_A 230.55,143.8 r270 bottom
R120 "1K" Yageo_RC0805_IPC_C 113.593,183.093 r0 bottom
R121 "2K" Yageo_RC0805_IPC_A 200.675,42.425 r270 top
R122 "100" Yageo_RC0805_IPC_A 241.023,144.499 r0 bottom
R123 "220" Yageo_RC0805_IPC_A 214.85,147.45 r90 top
R124 "10K" Yageo_RC0805_IPC_A 234.565,155.964 r0 bottom
R125 "10K" Yageo_RC0805_IPC_A 240.425,149.775 r180 bottom
R126 "RC0805FR-07100KL" Yageo_RC0805_IPC_A 234.952,122.85 r90 bottom
R127 "RC0805FR-07100KL" Yageo_RC0805_IPC_A 93.7,42.775 r90 bottom
R128 "RC0805FR-07100KL" Yageo_RC0805_IPC_A 93.525,32.924 r90 bottom
R129 "RC0805FR-07100KL" Yageo_RC0805_IPC_A 109.099,19.525 r180 bottom
R130 "RC0805FR-07100KL" Yageo_RC0805_IPC_A 92.509,6.356 r270 bottom
R131 "RC0805FR-07100KL" Yageo_RC0805_IPC_A 93.69,147.85 r90 bottom
R132 "RC0805FR-07100KL" Yageo_RC0805_IPC_A 93.818,137.625 r90 bottom
R133 "RC0805FR-07100KL" Yageo_RC0805_IPC_A 107.95,124.199 r180 bottom
R134 "RC0805FR-07100KL" Yageo_RC0805_IPC_A 92.225,114.475 r270 bottom
R135 "RC0805FR-07100KL" Yageo_RC0805_IPC_A 109.175,94.05 r180 bottom
R136 "RC0805FR-07100KL" Yageo_RC0805_IPC_A 93.089,191.328 r90 bottom
R137 "RC0805FR-07100KL" Yageo_RC0805_IPC_A 93.225,182.75 r90 bottom
R138 "RC0805FR-07100KL" Yageo_RC0805_IPC_A 93.75,78.4 r90 bottom
R139 "RC0805FR-07100KL" Yageo_RC0805_IPC_A 109.768,170.475 r180 bottom
R140 "RC0805FR-07100KL" Yageo_RC0805_IPC_A 109.322,65.3 r180 bottom
R141 "RC0805FR-07100KL" Yageo_RC0805_IPC_A 93.143,160.833 r270 bottom
R142 "RC0805FR-07100KL" Yageo_RC0805_IPC_A 93.75,55.198 r270 bottom
R143 "10K" Yageo_RC0805_IPC_C 112.347,136.22 r270 bottom
R144 "10K" Yageo_RC0805_IPC_C 111.668,32.275 r270 bottom
R145 "1K" Yageo_RC0805_IPC_C 110.451,184.85 r180 bottom
R146 "1K" Yageo_RC0805_IPC_C 109.875,79.5 r180 bottom
R147 "1K" Yageo_RC0805_IPC_C 114.22,32.9 r180 bottom
R148 "1K" Yageo_RC0805_IPC_C 109.775,138.775 r180 bottom
RG1 "Reg_Fairchild_LM7805CT_eec" TO-220(bend_rad) 175.679,14.06 r0 top
RP6 "10k" Bourns_3296W_MFG 155.748,187.11 r270 top
RP7 "10k" Bourns_3296W_MFG 176.068,187.11 r270 top
RP8 "10k" Bourns_3296W_MFG 145.715,187.11 r270 top
RP9 "10k" Bourns_3296W_MFG 166.035,187.11 r270 top
SW1 "4-1437565-2" SW4_FSM-5P23_TEC 219.248,173.389 r0 top
SW2 "4-1437565-2" SW4_FSM-5P23_TEC 183.942,173.389 r0 top
SW3 "4-1437565-2" SW4_FSM-5P23_TEC 201.595,173.389 r0 top
TP1 "Test_Point_PCB" Test_Point#1 228.079,139.778 r90 top
TP2 "Test_Point_PCB" Test_Point#1 208.225,142.862 r0 top
TP3 "Test_Point_PCB" Test_Point#2 190.862,95.445 r180 top
TP4 "Test_Point_PCB" Test_Point#2 205.517,120.125 r180 top
TP5 "Test_Point_PCB" Test_Point#2 195.229,98.675 r0 top
TP6 "Test_Point_PCB" Test_Point#2 141.043,119.425 r0 top
TP7 "Test_Point_PCB" Test_Point#1 228.75,155.2 r90 top
TP8 "Test_Point_PCB" Test_Point#2 103.593,6.76 r0 top
TP9 "Test_Point_PCB" Test_Point#1 232.302,176.342 r0 top
TP10 "Test_Point_PCB" Test_Point#1 230.757,179.815 r90 top
TP11 "Test_Point_PCB" Test_Point#1 232.799,167.199 r90 top
TP12 "Test_Point_PCB" Test_Point#1 234.99,141.097 r180 top
TP13 "Test_Point_PCB" Test_Point#2 234.827,189.798 r270 top
TP14 "Test_Point_PCB" Test_Point#2 181.684,196.3 r90 top
TP15 "Test_Point_PCB" Test_Point#1 160.193,182.914 r270 top
TP16 "Test_Point_PCB" Test_Point#1 171.115,182.914 r270 top
TP17 "Test_Point_PCB" Test_Point#1 150.469,172.181 r180 top
TP18 "Test_Point_PCB" Test_Point#1 170.023,171.867 r90 top
TP19 "Test_Point_PCB" Test_Point#1 155.748,182.914 r270 top
TP20 "Test_Point_PCB" Test_Point#1 176.068,182.914 r270 top
TP21 "Test_Point_PCB" Test_Point#1 145.715,182.914 r270 top
TP22 "Test_Point_PCB" Test_Point#1 166.035,182.914 r270 top
TP23 "Test_Point_PCB" Test_Point#2 108.418,44.724 r0 top
TP24 "Test_Point_PCB" Test_Point#3 108.825,149.525 r0 top
TP25 "Test_Point_PCB" Test_Point#2 103.593,42.065 r90 top
TP26 "Test_Point_PCB" Test_Point#4 103.606,147.339 r90 top
TP27 "Test_Point_PCB" Test_Point#5 127.618,38.401 r90 top
TP28 "Test_Point_PCB" Test_Point#6 126.223,145.135 r90 top
TP29 "Test_Point_PCB" Test_Point#2 103.593,37.966 r90 top
TP30 "Test_Point_PCB" Test_Point#2 103.768,143.55 r90 top
TP31 "Test_Point_PCB" Test_Point#1 237.12,144.379 r180 top
TP32 "Test_Point_PCB" Test_Point#1 233,182.57 r90 top
TP33 "Test_Point_PCB" Test_Point#2 109.193,12.775 r0 top
TP34 "Test_Point_PCB" Test_Point#2 109.093,117.702 r0 top
TP35 "Test_Point_PCB" Test_Point#2 103.868,10.843 r90 top
TP36 "Test_Point_PCB" Test_Point#2 103.606,116.025 r270 top
TP37 "Test_Point_PCB" Test_Point#7 127.643,8.455 r90 top
TP38 "Test_Point_PCB" Test_Point#8 127.07,117.025 r90 top
TP39 "Test_Point_PCB" Test_Point#9 55.097,13.054 r90 top
TP40 "Test_Point_PCB" Test_Point#10 53.431,118.054 r90 top locked
TP42 "Test_Point_PCB" Test_Point#2 103.593,112.106 r270 top
TP43 "Test_Point_PCB" Test_Point#11 59.693,26.321 r90 top
TP44 "Test_Point_PCB" Test_Point#12 56.593,128.8 r90 top
TP45 "Test_Point_PCB" Test_Point#2 100.596,19.4 r90 top
TP46 "Test_Point_PCB" Test_Point#2 101.325,123.875 r90 top
TP47 "Test_Point_PCB" Test_Point#2 95.368,86.649 r90 top
TP48 "Test_Point_PCB" Test_Point#13 106.818,196.648 r90 top
TP49 "Test_Point_PCB" Test_Point#2 103.715,86.929 r180 top
TP50 "Test_Point_PCB" Test_Point#14 103.693,193.806 r90 top
TP51 "Test_Point_PCB" Test_Point#15 146.756,81.4 r90 top
TP52 "Test_Point_PCB" Test_Point#16 128.5,185.7 r90 top
TP53 "Test_Point_PCB" Test_Point#2 103.694,83.051 r90 top
TP54 "Test_Point_PCB" Test_Point#2 103.693,189.088 r90 top
TP55 "Test_Point_PCB" Test_Point#1 226.8,158.625 r90 top
TP56 "Test_Point_PCB" Test_Point#1 168.825,30.667 r90 top
TP57 "Test_Point_PCB" Test_Point#2 109.293,59.002 r90 top
TP58 "Test_Point_PCB" Test_Point#2 109.693,164.125 r0 top
TP59 "Test_Point_PCB" Test_Point#2 103.606,57.89 r90 top
TP60 "Test_Point_PCB" Test_Point#17 103.506,164.171 r90 top
TP61 "Test_Point_PCB" Test_Point#18 128.55,55.825 r90 top
TP62 "Test_Point_PCB" Test_Point#19 138.73,160.275 r90 top
TP63 "Test_Point_PCB" Test_Point#20 53.59,58 r90 top
TP64 "Test_Point_PCB" Test_Point#21 52.9,162.71 r90 top
TP65 "Test_Point_PCB" Test_Point#2 103.769,53.859 r0 top
TP66 "Test_Point_PCB" Test_Point#2 103.718,158.871 r90 top
TP67 "Test_Point_PCB" Test_Point#22 59.387,69.75 r90 top
TP68 "Test_Point_PCB" Test_Point#23 59.743,176.275 r90 top
TP69 "Test_Point_PCB" Test_Point#2 97.983,63.208 r90 top
TP70 "Test_Point_PCB" Test_Point#2 97.15,170.35 r90 top
TP71 "Test_Point_PCB" Test_Point#1 195.75,104.325 r90 top
TP72 "Test_Point_PCB" Test_Point#1 228.9,113.325 r90 top
TP73 "Test_Point_PCB" Test_Point#1 174.825,162.975 r90 top
TP74 "Test_Point_PCB" Test_Point#1 104.501,183.3 r90 top
TP75 "Test_Point_PCB" Test_Point#1 106.922,79.5 r90 top
TP76 "Test_Point_PCB" Test_Point#1 101.718,137.075 r90 top
TP77 "Test_Point_PCB" Test_Point#1 101.969,30.875 r90 top
TP78 "Test_Point_PCB" Test_Point#1 129.488,146.113 r90 top
TP79 "Test_Point_PCB" Test_Point#1 125.35,48.25 r90 top
TP80 "Test_Point_PCB" Test_Point#1 127.05,122.825 r90 top
TP81 "Test_Point_PCB" Test_Point#1 124.718,18.757 r90 top
TP82 "Test_Point_PCB" Test_Point#1 135.35,185.675 r90 top
TP83 "Test_Point_PCB" Test_Point#1 126.718,77.525 r90 top
TP84 "Test_Point_PCB" Test_Point#1 125.218,169.873 r90 top
TP85 "Test_Point_PCB" Test_Point#1 127.85,63.775 r90 top
TP86 "Test_Point_PCB" Test_Point#1 194.75,92.3 r90 top
TP87 "Test_Point_PCB" Test_Point#1 129.225,168.112 r90 top
TP88 "Test_Point_PCB" Test_Point#1 143.875,43.342 r90 top
TP89 "Test_Point_PCB" Test_Point#1 131.95,33.625 r90 top
TP90 "Test_Point_PCB" Test_Point#1 109.525,153.875 r90 top
U1 "LM1117MPX-3.3/NOPB" DCY0004A_L 218.275,85.225 r180 bottom
U2 "B0505S-1WR3" FP-B0505S-1WR3-MFG 224.575,132.025 r90 top
U3 "ADUM1401BRWZ" ADI-RW-16_M 235.625,132.175 r90 bottom
U4 "STM32F303CCT6" LQFP48-7x7mm 187.888,125.359 r225 bottom locked
U5 "IR2104SPBF" SOIC8_INF-M 114.718,39.231 r180 bottom locked
U6 "IR2104SPBF" SOIC8_INF-M 114.718,145.585 r180 bottom locked
U7 "IR2104SPBF" SOIC8_INF-M 114.718,114.729 r180 bottom locked
U8 "IR2104SPBF" SOIC8_INF-M 114.718,9.309 r180 bottom locked
U9 "IR2104SPBF" SOIC8_INF-M 114.718,84.976 r180 bottom locked
U10 "IR2104SPBF" SOIC8_INF-M 114.718,190.736 r180 bottom locked
U11 "IR2104SPBF" SOIC8_INF-M 114.718,56.5 r180 bottom locked
U12 "IR2104SPBF" SOIC8_INF-M 114.718,160.81 r180 bottom locked
U13 "ACS758" ACS758-100 200,80.175 r90 top locked
U14 "MCP6001" SOT-23-5 109.472,72.8 r0 bottom
U15 "MCP6001" SOT-23-5 109.918,177.873 r0 bottom
U16 "MCP6001" SOT-23-5 109.055,27.65 r0 bottom
U17 "MCP6001" SOT-23-5 109.427,131.823 r0 bottom
U18 "MAX485ECSA+" SOIC127P600X175-8N 235.2,149.775 r90 bottom
VD1 "DIODE" DO201AB 59,38 r90 top locked
VD2 "DIODE" DO201AB 59,142.225 r90 top locked
VD3 "DIODE" DO201AB 49.5,148.4 r270 top locked
VD4 "DIODE" DO201AB 49.5,43.491 r270 top locked
VD5 "DIODE" DO201AB 59,10 r90 top locked
VD6 "DIODE" DO201AB 59,115 r90 top locked
VD7 "DIODE" DO201AB 49.5,16 r270 top locked
VD8 "DIODE" DO201AB 49.5,120.875 r270 top locked
VD9 "DIODE" DO201AB 59,83 r90 top locked
VD10 "DIODE" DO201AB 59,188 r90 top locked
VD11 "DIODE" DO201AB 49.5,88.325 r270 top locked
VD12 "DIODE" DO201AB 49.5,193.325 r270 top locked
VD13 "DIODE" DO201AB 59,161 r90 top
VD14 "DIODE" DO201AB 59,55 r90 top locked
VD15 "DIODE" DO201AB 49.5,165.975 r270 top
VD16 "DIODE" DO201AB 49.5,60.854 r270 top locked
VD17 "15V" DO-017AA 200.675,31.125 r270 top
VD18 "LED" LED-0603 200.675,46.801 r270 top
VT1 "IRF3205" TO-220(bend2) 76.01,40.3 r270 top locked
VT2 "IRF3205" TO-220(bend2) 75.293,145.1 r270 top locked
VT3 "IRF3205" TO-220(bend2) 33.275,145.3 r90 top locked
VT4 "IRF3205" TO-220(bend2) 33.275,40.3 r90 top
VT5 "IRF3205" TO-220(bend2) 75.793,117.8 r270 top locked
VT6 "IRF3205" TO-220(bend2) 33.275,117.8 r90 top locked
VT7 "IRF3205" TO-220(bend2) 76.293,12.8 r270 top locked
VT8 "IRF3205" TO-220(bend2) 75.393,85.3 r270 top locked
VT9 "IRF3205" TO-220(bend2) 75.493,190.3 r270 top locked
VT10 "IRF3205" TO-220(bend2) 33.275,12.8 r90 top locked
VT11 "IRF3205" TO-220(bend2) 33.275,85.3 r90 top locked
VT12 "IRF3205" TO-220(bend2) 33.275,190.3 r90 top locked
VT13 "IRF3205" TO-220(bend2) 75.493,57.8 r270 top locked
VT14 "IRF3205" TO-220(bend2) 75.593,162.8 r270 top locked
VT15 "IRF3205" TO-220(bend2) 33.275,57.8 r90 top
VT16 "IRF3205" TO-220(bend2) 33.275,162.8 r90 top locked
ZD1 "P6SMB16CA" DO-214AA 97.025,42.775 r90 bottom
ZD2 "P6SMB16CA" DO-214AA 96.775,33.025 r90 bottom
ZD3 "P6SMB16CA" DO-214AA 96.85,147.85 r90 bottom
ZD4 "P6SMB16CA" DO-214AA 169.25,6.15 r270 bottom
ZD5 "P6SMB16CA" DO-214AA 97.1,137.975 r90 bottom
ZD6 "P6SMB16CA" DO-214AA 107.95,121.385 r180 bottom
ZD7 "P6SMB16CA" DO-214AA 108.049,16.432 r180 bottom
ZD8 "P6SMB16CA" DO-214AA 95.45,114.475 r270 bottom
ZD9 "P6SMB16CA" DO-214AA 95.743,6.006 r270 bottom
ZD10 "P6SMB16CA" DO-214AA 109.175,91.3 r180 bottom
ZD11 "P6SMB16CA" DO-214AA 96.188,191.255 r90 bottom
ZD12 "P6SMB16CA" DO-214AA 96.3,182.75 r90 bottom
ZD13 "P6SMB16CA" DO-214AA 96.7,78.4 r90 bottom
ZD14 "P6SMB16CA" DO-214AA 109.6,167.675 r180 bottom
ZD15 "P6SMB16CA" DO-214AA 109.293,62.6 r180 bottom
ZD16 "P6SMB16CA" DO-214AA 96.318,160.932 r270 bottom
ZD17 "P6SMB16CA" DO-214AA 97.025,55.523 r270 bottom
ZD18 "P6SMB16CA" DO-214AA 233.2,163.925 r0 bottom
ZD19 "P6SMB16CA" DO-214AA 233.125,160.1 r0 bottom

## Footprints (in the part's own frame and the unit in brackets; to place one, negate y for a bottom-side part, rotate by r counter-clockwise, add the part's x,y. Pads: shape width x height; smd on the part's side, far side on the other; paste and mask are expansions set on the pad)
8-SOIC [mm] "SOIC, 8-Leads, Body 4,90x3,90mm, Pitch 1,27mm, IPC Medium Density"
  rrect50% 1.6x0.8 smd: 1(-2.6,2.025) 4(-2.6,-2.025) 5(2.6,-2.025) 8(2.6,2.025)
  rrect50% 1.6x0.6 smd: 2(-2.6,0.635) 3(-2.6,-0.635) 6(2.6,-0.635) 7(2.6,0.635)
  silkscreen extent -1.5,-2.5 1.5,2.5, body extent -3,-2.45 3,2.45, height 1.75
1000uF_10V_Size_F [mm]
  rect 5.5x2.5 smd: 1(4.5,0) 2(-4.5,0)
  Top Layer region: 1.778,-1.27 7.278,-1.27 7.278,1.23 1.778,1.23
  Top Layer region: -7.25,-1.25 -1.75,-1.25 -1.75,1.25 -7.25,1.25
  silkscreen extent -5.21,-5.33 5.71,5.59, body extent -5.85,-5.15 5.85,5.15, height 10.32
4700uF_100V [mm]
  round 6.35 hole 2.54: 1(-5,0) 2(5,0)
  silkscreen extent -18,-18 18,18, body extent -25.46,-25.46 25.46,25.46, height 43
61300511121 [mm] "Pin Header, pitch 2.54 mm, THT, Vertical, single row, 5p"
  rrect50% 1.6x1.6 hole 1.1: 1(-5.08,0)
  round 1.6 hole 1.1: 2(-2.54,0) 3(0,0) 4(2.54,0) 5(5.08,0)
  silkscreen extent -6.5,-1.35 6.5,1.35, body extent -6.35,-1.27 6.35,1.27, height 8.57
61900311121 [mm] "2.54mm Male Locking Header, 3p"
  rect 1.5x1.5 hole 1: 1(2.54,0.3)
  round 1.5 hole 1: 2(0,0.3) 3(-2.54,0.3)
  silkscreen extent -3.98,-3.52 3.98,2.98, body extent -3.81,-2.9 3.81,2.9, height 11.53
691101710002 [mm] "5,00mm - modular - blue - Horizontal entry with pressure clamp - 12,6mm height - 02p"
  rrect50% 1.95x1.95 hole 1.3: 1(-2.5,-0.5)
  round 1.95 hole 1.3: 2(2.5,-0.5)
  silkscreen extent -5.6,-4.5 5.6,4.5, body extent -5.6,-4.5 5.6,4.5, height 12.65
691101710003 [mm] "5,00mm - modular - blue - Horizontal entry with pressure clamp - 12,6mm height - 03p"
  rrect50% 1.95x1.95 hole 1.3: 1(-5,-0.5)
  round 1.95 hole 1.3: 2(0,-0.5) 3(5,-0.5)
  silkscreen extent -8.1,-4.5 8.1,4.5, body extent -8.1,-4.5 8.1,4.5, height 12.65
ACS758-100 [mil]
  round 60 hole 47.24: 1(-80,-385) 2(-5,-385) 3(70,-385)
  oval 350x200 hole 90 slot 195 at 0 deg: 4(185,460) 5(-205,465)
  silkscreen extent -385,325 370,665, body extent -281,-404 271,492, height 280
ADI-RW-16_M [mm] "SOIC, 16-Leads, Body 10.3x7.5mm, Pitch 1.27mm, IPC Low Density"
  oval 2.6x0.7 smd: 1(-4.625,4.445) 2(-4.625,3.175) 3(-4.625,1.905) 4(-4.625,0.635) 5(-4.625,-0.635) 6(-4.625,-1.905) 7(-4.625,-3.175) 8(-4.625,-4.445) 9(4.625,-4.445) 10(4.625,-3.175) 11(4.625,-1.905) 12(4.625,-0.635) 13(4.625,0.635) 14(4.625,1.905) 15(4.625,3.175) 16(4.625,4.445)
  silkscreen extent -4.75,-5.25 2.93,5.47, body extent -3.8,-5.25 3.8,5.25, height 2.65
Bourns_3296W_MFG [mm]
  rect 1.2x1.2 hole 0.7 paste-1000 mask+0: 1(0.005,-2.54)
  round 1.2 hole 0.7 paste-1000 mask+0: 2(0.005,0) 3(0.005,2.54)
  silkscreen extent -2.48,-4.89 2.48,4.89, body extent -2.58,-4.99 2.58,4.99, height 0.25
CAP-1206 [mm]
  rect 1.3x1.8 smd: 1(-1.425,0) 2(1.425,0)
  silkscreen extent -2.37,-1.2 2.37,1.2, body extent -1.68,-0.87 1.67,0.87, height 0.95
CAPPM7343X430N#1 [mm]
  rect 2.35x2.45 smd: 1(-3.1,0) 2(3.1,0)
  silkscreen extent -4.27,-2.15 3.65,2.15, body extent -3.59,-2.35 3.6,2.35, height 4.12
CAPPM7343X430N#2 [mm]
  rect 3.4x2.45 smd: 1(-2.6,0) 2(2.6,0)
  silkscreen extent -4.3,-2.15 3.65,2.15, body extent -3.59,-2.35 3.6,2.35, height 4.12
CAPPOL-12x25 [mm]
  round 2 hole 1: 1(-2.5,0) 2(2.5,0)
  silkscreen extent -6.5,-6.5 6.5,6.5, body extent -6.25,-6.25 6.25,6.25, height 25
Coil_drosel [mil]
  oval 190x250 hole 120: 1(-515,1130) 2(-285,1135)
  round 260 hole 140: GND(-400,215)
  Top Layer circle w300: c-400,215 r199.81
  Top Layer region: -655,975.02 -420,975.02 -420,1305.02 -655,1305.02
  Top Layer region: -380,975.02 -145,975.02 -145,1305.02 -380,1305.02
  Bottom Layer circle w300: c-400,215 r199.81
  Bottom Layer region: -655,975.02 -420,975.02 -420,1305.02 -655,1305.02
  Bottom Layer region: -380,975.02 -145,975.02 -145,1305.02 -380,1305.02
  silkscreen extent -1120,-510 320,1290, body extent -1148,-535 348,1175, height 826
Conn_Tianli_T-800 [mm]
  oval 5.08x5.588 hole 2.159: 1(-5,-5) 1(-5,5) 2(5,-5) 2(5,5)
  silkscreen extent -10.41,-11.05 10.16,8, body extent -10.25,-11.3 10.25,7.55, height 30.75
CR2032_BAT [mil]
  round 120 hole 60: 1(-310,0) 2(475,0)
  silkscreen extent -400,-400 400,400, body extent -432,-435 525,439, height 350
DCY0004A_L [mm] "SOT223, 4-Leads, Body 6.7x3.7mm, Pitch 2.3mm, IPC High Density"
  rrect11% 1.45x0.9 smd: 1(-3.075,2.3) 2(-3.075,0) 3(-3.075,-2.3)
  rrect7% 1.45x3.15 smd: 4(3.075,0)
  silkscreen extent -3.2,-3.35 2.05,3.42, body extent -3.5,-3.25 3.5,3.25, height 1.62
DO201AB [mm]
  round 2.2 hole 1.4: 1(-3.65,0) 2(2.8,0)
  silkscreen extent -2.28,-1.1 1.48,1.1, body extent -4.29,-2.8 5.6,2.8, height 15.69
DO-017AA [mm]
  round 2.5 hole 1.8: 1(-6,0) 2(6,0)
  silkscreen extent -7.2,-1.85 7.15,1.83, body extent -6.63,-1.7 6.37,1.7, height 3.4
DO-214AA [mm]
  rect 2.5x2.3 smd: 1(-2.15,0) 2(2.15,0)
  silkscreen extent -3.7,-1.5 3.7,1.5, body extent -2.65,-1.81 2.65,1.81, height 2.5
FP-6_560-5005_01-4-MFG [mm]
  rect 1.25x2 smd paste+0 mask+0: 1(-1.875,0) 2(1.875,0)
  silkscreen extent -3.33,-0.8 0.87,0.8, body extent -1.75,-0.8 1.75,0.8, height 1.6
FP-6_561-5001_02-4-MFG [mm]
  rect 1.6x1.6 hole 1.05 paste-1000 mask+0: 1(-4.888,0)
  round 1.6 hole 1.05 paste-1000 mask+0: 2(4.888,0)
  silkscreen extent -3.45,-1.3 3.45,1.3, body extent -5.79,-1.4 5.79,1.4, height 0.25
FP-B0505S-1WR3-MFG [mm]
  rect 1.55x1.55 hole 1 paste-1000 mask+0: 1(-3.81,-2.1)
  round 1.55 hole 1 paste-1000 mask+0: 2(-1.27,-2.1) 3(1.27,-2.1) 4(3.81,-2.1)
  silkscreen extent -6.52,-3.13 5.92,3.13, body extent -6.02,-3.22 6.02,3.22, height 0.25
FP-C0805C-DN-IPC_A [mm]
  rect 1.505x1.556 smd paste+0 mask+0: 1(-0.901,0) 2(0.901,0)
  silkscreen extent -1.65,-1.18 1.65,1.18, body extent -1,-0.63 1,0.63, height 0.88
FP-C0805C-DN-MFG [mm]
  rect 0.95x1.35 smd paste+0 mask+0: 1(-0.75,0) 2(0.75,0)
  silkscreen extent -1.1,-1.07 1.1,1.07, body extent -1,-0.62 1,0.62, height 0.88
FP-CRCW0805-e3-IPC_B [mm]
  rect 1.007x1.408 smd paste+0 mask+0: 1(-0.951,0) 2(0.951,0)
  silkscreen extent -0.07,-0.63 0.07,0.63, body extent -1,-0.63 1,0.63, height 0.5
FP-ECQ-E2224JFW-MFG [mm]
  rect 1.3x1.3 hole 0.8 paste-1000 mask+0: 1(-5,0)
  round 1.3 hole 0.8 paste-1000 mask+0: 2(5,0)
  silkscreen extent -6,-2.75 6,2.75, body extent -6.1,-2.85 6.1,2.85, height 0.25
FP-RT0805-IPC_C [mm]
  rect 0.808x1.262 smd paste+0 mask+0: 1(-0.802,0) 2(0.802,0)
  silkscreen extent -1.21,-1.07 1.21,1.07, body extent -1,-0.63 1,0.63, height 0.6
FP-RT0805-MFG [mm]
  rect 0.9x1.2 smd paste+0 mask+0: 1(-1.05,0) 2(1.05,0)
  silkscreen extent -0.23,-0.67 0.23,0.67, body extent -1,-0.63 1,0.63, height 0.6
FP-SF-MFG [mm]
  rect 4x2 smd paste+0 mask+0: 1(-3.55,0) 2(3.55,0)
  silkscreen extent -6.27,-4.25 4.25,4.25, body extent -5.8,-4.5 5.8,4.5, height 0.25
FP-SMA-MFG [mm]
  rect 2.5x1.7 smd paste+0 mask+0: 1(-2,0) 2(2,0)
  silkscreen extent -3.92,-1.46 2.3,1.46, body extent -2.6,-1.3 2.6,1.3, height 2.4
FP-SOD323-MFG [mm]
  rect 0.6x0.6 smd paste-1000 mask+0: 1(-1.1,0) 2(1.1,0)
  silkscreen extent -2.12,-0.67 0.43,0.67, body extent -1.53,-0.82 1.53,0.82, height 0.25
Jumper_2.54 [mil]
  round 60 hole 47.24: 1(0,0) 2(98.43,0)
  silkscreen extent -50,-50 150,50
LED-0603 [mm]
  rect 0.85x0.9 smd: 1(-0.775,0) 2(0.775,0)
  silkscreen extent -1.43,-0.67 1.45,0.67, body extent -0.83,-0.36 0.82,0.36, height 0.68
LED_BLUE [mm]
  rect 1.1x1.2 smd paste+0 mask+0: 1(-1.05,0) 2(1.05,0)
  silkscreen extent -2.27,-0.67 0.13,0.67, body extent -1,-0.63 1,0.63, height 0.8
LED_GREEN [mm]
  rect 1.1x1.2 smd paste+0 mask+0: 1(-1.05,0) 2(1.05,0)
  silkscreen extent -2.27,-0.67 0.13,0.67, body extent -1,-0.63 1,0.63, height 0.8
LED_Yellow [mm]
  rect 1.1x1.2 smd paste+0 mask+0: 1(-1.05,0) 2(1.05,0)
  silkscreen extent -2.27,-0.67 0.13,0.67, body extent -1,-0.63 1,0.63, height 0.8
LQFP48-7x7mm [mm]
  rect 1.194x0.305 smd paste+0 mask+0: 1(-4.25,2.75) 2(-4.25,2.25) 3(-4.25,1.75) 4(-4.25,1.25) 5(-4.25,0.75) 6(-4.25,0.25) 7(-4.25,-0.25) 8(-4.25,-0.75) 9(-4.25,-1.25) 10(-4.25,-1.75) 11(-4.25,-2.25) 12(-4.25,-2.75) 25(4.25,-2.75) 26(4.25,-2.25) 27(4.25,-1.75) 28(4.25,-1.25) 29(4.25,-0.75) 30(4.25,-0.25) 31(4.25,0.25) 32(4.25,0.75) 33(4.25,1.25) 34(4.25,1.75) 35(4.25,2.25) 36(4.25,2.75)
  rect 0.305x1.194 smd paste+0 mask+0: 13(-2.75,-4.25) 14(-2.25,-4.25) 15(-1.75,-4.25) 16(-1.25,-4.25) 17(-0.75,-4.25) 18(-0.25,-4.25) 19(0.25,-4.25) 20(0.75,-4.25) 21(1.25,-4.25) 22(1.75,-4.25) 23(2.25,-4.25) 24(2.75,-4.25) 37(2.75,4.25) 38(2.25,4.25) 39(1.75,4.25) 40(1.25,4.25) 41(0.75,4.25) 42(0.25,4.25) 43(-0.25,4.25) 44(-0.75,4.25) 45(-1.25,4.25) 46(-1.75,4.25) 47(-2.25,4.25) 48(-2.75,4.25)
  silkscreen extent -5.43,-5.35 5.35,5.35, body extent -4.5,-4.5 4.5,4.5, height 1.6
"MKP 100nF 275VAC" [mm]
  round 1.8 hole 0.9: 1(-5,0) 2(5,0)
  silkscreen extent -6.48,-2.54 6.48,2.67, body extent -6.5,-2.5 6.5,2.5, height 11.55
RES-2512 [mm]
  rect 1.8x1.45 smd: 1(-3.275,-1.225) 1(-3.275,1.225) 2(3.275,-1.225) 2(3.275,1.225)
  silkscreen extent -4.28,-2.05 4.25,2.05, body extent -3.2,-1.6 3.2,1.6, height 0.6
RES-3921 [mm]
  rect 2.75x6.2 smd: 1(-4.2,0) 2(4.2,0)
  silkscreen extent -5.8,-3.3 5.8,3.3, body extent -5,-2.6 5,2.6, height 0.83
SMTC-TSW-104-08-X-S [mm] ".025 SQ Post Terminal Strip Assembly, 1x4 Pins, Vertical, 2.54mm Pitch, Male"
  rect 1.55x1.55 hole 1.02: 1(0,0)
  round 1.55 hole 1.02: 2(2.54,0) 3(5.08,0) 4(7.62,0)
  silkscreen extent -1.46,-1.27 9.08,1.27, body extent -1.27,-1.27 8.89,1.27, height 8.38
SOIC8_INF-M [mm]
  rect 2.27x0.558 smd paste+0 mask+0: 1(-2.514,1.905) 2(-2.514,0.635) 3(-2.514,-0.635) 4(-2.514,-1.905) 5(2.514,-1.905) 6(2.514,-0.635) 7(2.514,0.635) 8(2.514,1.905)
  silkscreen extent -2.12,-2.63 2.12,2.63, body extent -3.1,-2.5 3.1,2.5, height 1.76
SOIC127P600X175-8N [mm]
  rect 1.525x0.65 smd: 1(-2.712,1.905) 2(-2.712,0.635) 3(-2.712,-0.635) 4(-2.712,-1.905) 5(2.712,-1.905) 6(2.712,-0.635) 7(2.712,0.635) 8(2.712,1.905)
  silkscreen extent -3.47,-2.45 1.6,2.58, body extent -3,-2.45 3,2.45, height 1.75
SOT-23-5 [mm]
  rect 0.9x0.65 smd: 1(-1.2,0.95) 2(-1.2,0) 3(-1.2,-0.95) 4(1.2,-0.95) 5(1.2,0.95)
  silkscreen extent -1.32,-1.55 0.35,1.95, body extent -1.4,-1.45 1.4,1.45, height 1.24
Sullins_SWR25X-NRTC-S06-ST-BA_MFG [mm]
  rect 1.55x1.55 hole 1 paste-1000 mask+0: 1(-6.35,0.3)
  round 1.55 hole 1 paste-1000 mask+0: 2(-3.81,0.3) 3(-1.27,0.3) 4(1.27,0.3) 5(3.81,0.3) 6(6.35,0.3)
  silkscreen extent -7.8,-3.67 7.8,3.05, body extent -7.9,-3.15 7.9,3.15, height 0.25
SW4_FSM-5P23_TEC [mil]
  rect 83x55 smd paste+0 mask+0: 1(-179,88) 2(179,88) 3(-179,-88) 4(179,-88)
  rect 90x90 hole 40: 1(-150,90) 2(150,90) 3(-150,-90) 4(150,-90)
  silkscreen extent -123,-123 123,123, body extent -152,-118 152,118, height 669
Test_Point#1 [mil]
  round 90 hole 47.24 paste+4 mask+4: 1(0,0)
Test_Point#2 [mil]
  round 90 hole 50 paste+4 mask+4: 1(0,0)
Test_Point#3 [mil]
  round 90 hole 50 paste+4 mask+4: 1(13.7,-4.53)
Test_Point#4 [mil]
  round 90 hole 50 paste+4 mask+4: 1(2.05,0)
Test_Point#5 [mil]
  round 90 hole 50 paste+4 mask+4: 1(0,35.43)
Test_Point#6 [mil]
  round 90 hole 50 paste+4 mask+4: 1(-1.38,-9.65)
Test_Point#7 [mil]
  round 90 hole 50 paste+4 mask+4: 1(0,25.59)
Test_Point#8 [mil]
  round 90 hole 50 paste+4 mask+4: 1(0,13.87)
Test_Point#9 [mil]
  round 90 hole 50 paste+4 mask+4: 1(0,43.2)
Test_Point#10 [mil]
  round 90 hole 50 paste+4 mask+4: 1(0,-22.42)
Test_Point#11 [mil]
  round 90 hole 50 paste+4 mask+4: 1(-17.57,17.72)
Test_Point#12 [mil]
  round 90 hole 50 paste+4 mask+4: 1(55.12,-94.49)
Test_Point#13 [mil]
  round 90 hole 50 paste+19.68 mask+4: 1(0,0)
Test_Point#14 [mil]
  round 90 hole 50 paste+4 mask+4: 1(-12.8,0)
Test_Point#15 [mil]
  round 90 hole 50 paste+4 mask+4: 1(0,59.06)
Test_Point#16 [mil]
  round 90 hole 50 paste+4 mask+4: 1(0,62.99)
Test_Point#17 [mil]
  round 90 hole 50 paste+4 mask+4: 1(-13.03,-3.43)
Test_Point#18 [mil]
  round 90 hole 50 paste+4 mask+4: 1(0,63.72)
Test_Point#19 [mil]
  round 90 hole 50 paste+4 mask+4: 1(0,55.12)
Test_Point#20 [mil]
  round 90 hole 50 paste+4 mask+4: 1(0,-16.16)
Test_Point#21 [mil]
  round 90 hole 50 paste+4 mask+4: 1(13.54,-43.31)
Test_Point#22 [mil]
  round 90 hole 50 paste+4 mask+4: 1(62.99,15.51)
Test_Point#23 [mil]
  round 90 hole 50 paste+4 mask+4: 1(19.69,29.53)
TO-220(bend2) [mil]
  round 180 hole 100: D(10,355)
  oval 70x90 hole 45: D(10,-440) G(-90,-440) S(110,-440)
  Top Layer region: -190,-300.03 210,-300.03 210,479.97 -190,479.97
  Bottom Layer region: -215,-310.03 240,-310.03 240,504.97 -215,504.97
  silkscreen extent -205,-305 225,495, body extent -185,-446 208,476, height 179
TO-220(bend_rad) [mil]
  oval 60x80 / inner oval 75x90 / far side oval 80x100 hole 40: 1(-85,-400) 2(15,-400) 3(115,-400)
  round 120 hole 60: 2(10,-185)
  body extent -285,-481 306,-50, height 994
"Type 3mm" [mm] "THT, LED-3mm, 2pin- Body 4.15mm(max)"
  round 1.6 hole 1: 1(1.27,0) 2(-1.27,0)
  silkscreen extent -1.66,-1.95 1.4,1.95, body extent -1.93,-1.94 1.87,1.94, height 10.5
WE-PD2_1054 [mm] "SMD Power Inductor, 2-Leads, body 10x9mm"
  rect 3.75x9.5 smd: 1(-1273.125,-1270) 2(-1266.875,-1270)
  silkscreen extent -1275.62,-1270.12 -1275.37,-1269.88, body extent -1275.04,-1274.5 -1264.96,-1265.5, height 5.43
Wurth_Electronics_0_MFG [mm]
  rect 1.1x1.2 smd paste+0 mask+0: 1(-1.05,0) 2(1.05,0)
  silkscreen extent -2.27,-0.67 0.13,0.67, body extent -1.7,-0.77 1.7,0.77, height 0.25
Yageo_RC0805_IPC_A [mm]
  rect 1.157x1.508 smd paste+0 mask+0: 1(-1.076,0) 2(1.076,0)
  silkscreen extent -0.12,-0.63 0.12,0.63, body extent -1,-0.62 1,0.63, height 0.6
Yageo_RC0805_IPC_C [mm]
  rect 0.757x1.308 smd paste+0 mask+0: 1(-0.876,0) 2(0.876,0)
  silkscreen extent -0.12,-0.63 0.12,0.63, body extent -1,-0.62 1,0.63, height 0.6